# Altium PCB PCB-MAIN.PcbDoc (part 5 of 6)
Units mm, origin at the board's own origin, x right, y up, seen from the top; angles counter-clockwise.
Board outline 110 x 75 mm, 8 copper layers (F.Cu, In1.Cu, In2.Cu, In3.Cu, In4.Cu, In5.Cu, In6.Cu, B.Cu); 251 components, 185 nets, 1143 pads, 853 vias.
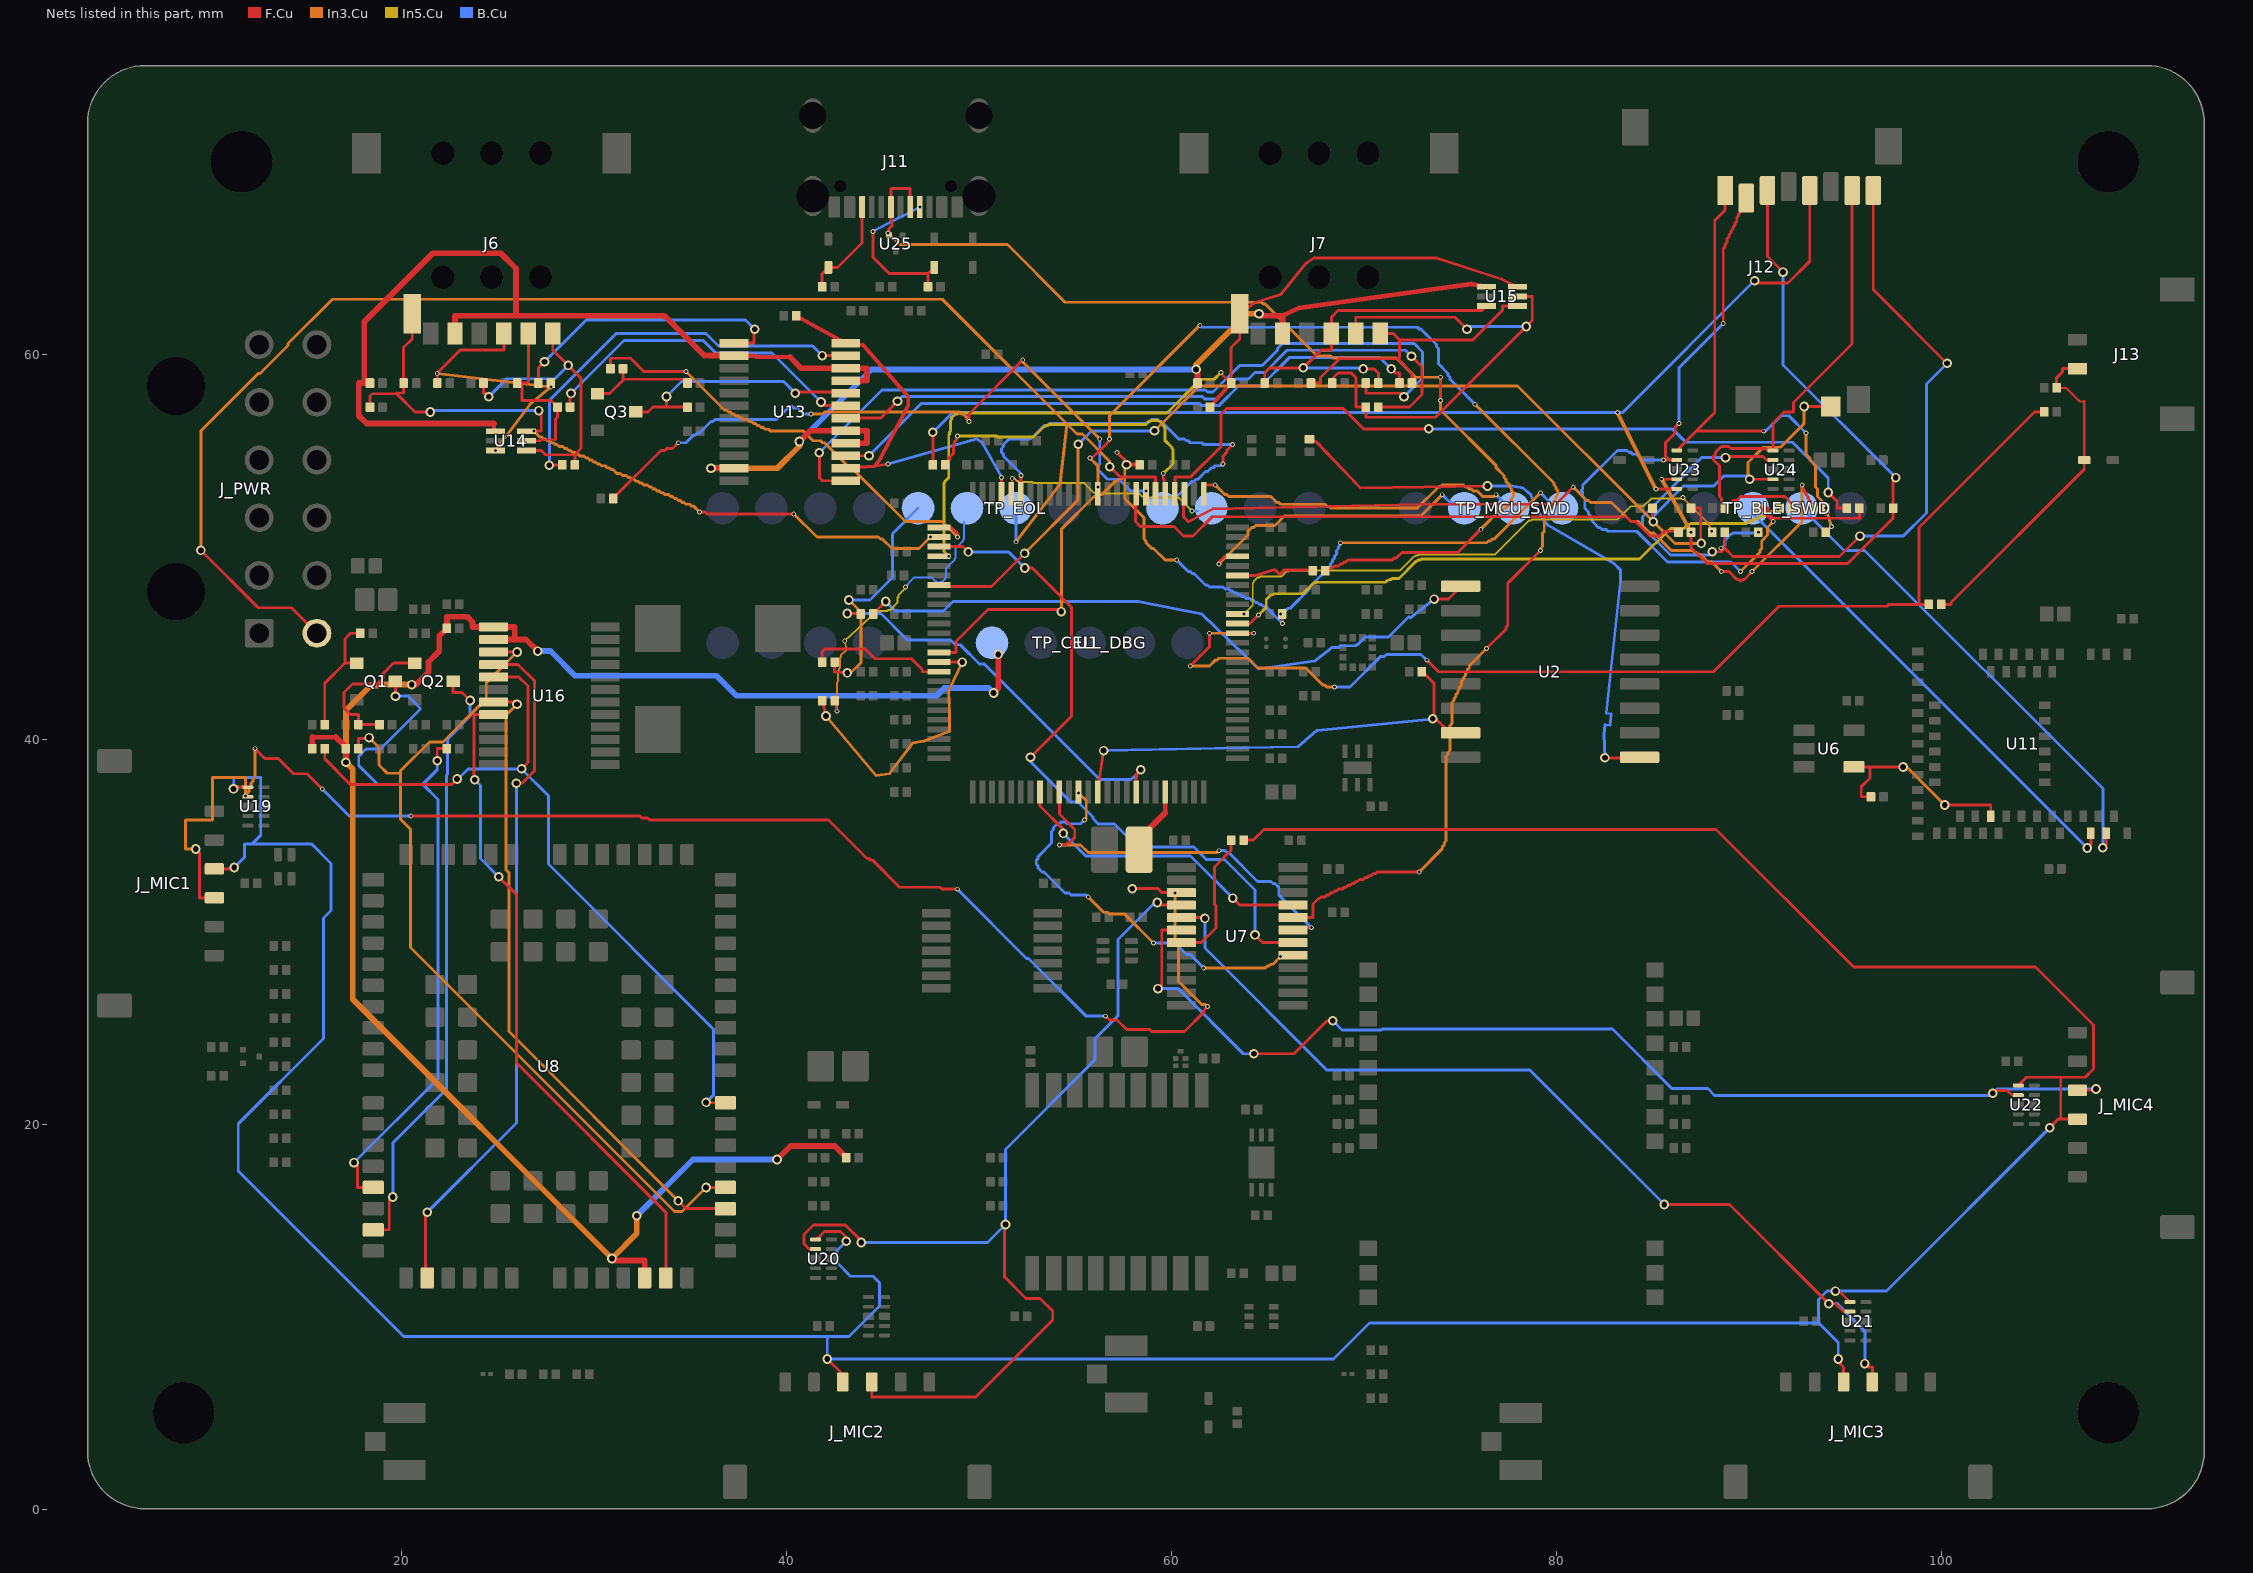
[diagram p10: the nets of this part, all layers, seen from the top]

## Via types
v1: diameter 0.5, hole 0.3, F.Cu to B.Cu, tented both sides, 579 vias
v2: diameter 0.25, hole 0.15, F.Cu to B.Cu, tented both sides, 274 vias

## Nets (pads, with @x,y where several pads share a name; then routed paths per layer and width w, separated by ;. In a path a pad name is that pad's centre, name@x,y a point inside that pad or via, vN(x,y) a via of type N, cw(c..) or ccw(c..) an arc to the next point about the centre after c; other vN are vias at no path point) (continued)
NOR_IO2_U2: R11.2 U2.9 | length 31.1
  F.Cu w0.15: R11.2@67.185,55.6 67.535,55.475 69.835,53.075 v1(76.435,53.175) ; v1(82.535,39.05) 84.285,39.05 84.305,39.05 U2.9@84.335,39.08
  B.Cu w0.15: v1(76.435,53.175) 77.735,53.175 78.285,53.075 78.685,52.725 79.285,51.475 79.585,51.125 83.035,49.125 83.335,48.825 83.335,48.125 82.603,41.369 82.862,41.341 82.797,40.744 82.539,40.772 82.485,40.275 v1(82.535,39.05)
NOR_IO3_U1: R12.1 U1.43 | length 21.1
  F.Cu w0.15: v1(43.16,46.55) R12.1@43.91,46.55 ; U1.43@58.185,37.275 58.16,37.3 58.16,38.175 v1(58.41,38.425)
  B.Cu w0.15: v1(43.16,46.55) 44.91,46.55 46.285,45.175 48.535,45.175 48.785,44.925 49.035,44.925 50.035,43.925 50.285,43.925 56.285,37.925 57.91,37.925 58.035,38.05 58.16,38.05 58.16,38.175 v1(58.41,38.425)
NOR_IO3_U2: R12.2 U2.1 | length 33.9
  F.Cu w0.15: R12.2@44.51,46.525 44.535,46.55 v1(45.16,47.175) ; v1(73.66,47.3) 74.41,47.3 75.035,47.925 U2.1@75.035,47.97
  B.Cu w0.15: v1(45.16,47.175) 45.66,46.675 48.16,46.675 48.66,47.175 58.285,47.175 61.585,46.525 64.535,43.675 67.435,44.075 68.285,44.725 ; 68.335,44.775 68.685,44.775 68.785,44.875 69.585,44.875 69.635,44.925 69.685,44.925 70.085,45.325 71.285,45.325 72.335,46.375 72.385,46.375 ; 72.435,46.325 v1(73.66,47.3)
NOR_NCS_U2: R7.2 U1.39 U2.7 | length 24.3
  F.Cu w0.15: U1.39@56.185,37.275 56.235,37.725 v1(56.485,39.425) ; R7.2@73.01,43.525 73.035,43.55 73.66,42.925 v1@73.66,41.175 ; v1@73.634,41.124 v1(73.585,41.075) v1@73.66,41.175 ; U2.7@75.035,40.35 75.035,40.3 74.535,40.3 v1@73.66,41.175
  B.Cu w0.15: v1(56.485,39.425) 66.585,39.625 67.585,40.475 v1(73.585,41.075)
NRF_RESET_N: R78.2 U6.4 U11.40 | length 10.7
  F.Cu w0.15: U6.4@95.485,38.575 96.312,38.575 ; R78.2@96.36,37.025 95.858,37.025 95.858,37.544 96.312,37.998 96.312,38.575 ; v1(98.028,38.575) 96.312,38.575 ; v1(100.191,36.602) 102.585,36.602 U11.40@102.585,36.025
  In3.Cu w0.15: v1(98.028,38.575) 98.217,38.575 v1(100.191,36.602)
NRF_SWCLK: TP_BLE_SWD.3 U11.53 | length 25.6
  F.Cu w0.15: v1(108.41,34.373) 108.585,34.548 U11.53@108.585,35.125
  B.Cu w0.15: TP_BLE_SWD.3@92.765,52.025 94.962,49.828 96.032,49.828 108.41,37.45 v1(108.41,34.373)
NRF_SWDIO: TP_BLE_SWD.2 U11.51 | length 25.7
  F.Cu w0.15: v1(107.599,34.363) 107.785,34.548 U11.51@107.785,35.125
  B.Cu w0.15: TP_BLE_SWD.2@90.225,52.025 90.225,51.737 v1(107.599,34.363)
NRST: C18.1 R1.2 TP_MCU_SWD.4 U1.14 | length 50.2
  F.Cu w0.15: U1.14@47.935,44.525 48.812,44.525 48.812,45.103 50.473,46.764 54.173,46.764 v1(54.289,46.648) ; v2(57.185,54.925) 57.785,54.325 C18.1@58.285,54.325 ; v1(57.676,54.275) C18.1@58.36,54.275 ; v2(65.785,46.025) R1.2@65.785,46.425
  In3.Cu w0.15: 54.285,50.925 55.985,52.625 56.185,52.625 56.285,52.725 56.385,52.725 57.085,53.425 57.185,53.425 57.285,53.525 57.385,53.525 57.485,53.625 57.585,53.625 ; v1(54.289,46.648) 54.289,50.888 ; v2(57.185,54.925) 57.585,54.525 57.585,52.525 58.585,51.525 58.585,50.425 58.685,50.325 58.685,50.225 58.985,49.925 59.085,49.925 59.685,49.325 v2(60.285,49.325) ; v2(68.785,50.225) 76.385,50.225 76.485,50.325 76.585,50.325 76.685,50.425 76.785,50.425 v2(79.185,52.825)
  B.Cu w0.15: v2(60.285,49.325) 60.885,48.725 60.985,48.725 61.085,48.625 61.185,48.625 61.785,48.025 61.885,48.025 61.985,47.925 62.685,47.925 62.785,47.825 62.985,47.825 63.085,47.725 63.185,47.725 63.285,47.625 63.385,47.625 63.485,47.525 63.585,47.525 63.685,47.425 63.785,47.425 63.885,47.325 64.085,47.325 64.185,47.225 64.285,47.225 64.385,47.125 64.485,47.125 64.585,47.025 64.685,47.025 64.785,46.925 64.885,46.925 v2(65.785,46.025) ; v2(65.685,46.525) 65.885,46.725 65.985,46.725 66.085,46.825 66.185,46.825 67.185,47.825 67.185,47.925 68.285,49.025 68.285,49.125 68.385,49.225 68.385,49.325 68.485,49.425 68.485,49.525 68.585,49.625 68.585,49.825 68.685,49.925 68.685,50.025 68.785,50.125 v2(68.785,50.225) ; v2(79.185,52.825) TP_MCU_SWD.4@79.685,52.325
PDM_CLK: U1.37 U7.17 | length 21
  In3.Cu w0.15: v2(55.185,37.225) 55.585,36.825 55.585,35.925 v2(55.485,35.825) ; v2(55.685,31.825) 56.485,31.025 56.685,31.025 56.785,30.925 57.585,30.925 v2(59.085,29.425) ; v2(61.685,28.125) 64.885,28.125 64.985,28.225 65.085,28.225 65.185,28.325 65.285,28.325 v2(65.685,28.725)
  B.Cu w0.15: v2(55.485,35.825) 55.285,35.625 54.585,35.625 54.485,35.725 54.285,35.725 54.185,35.625 54.085,35.625 53.885,35.425 53.885,35.325 53.785,35.225 53.785,34.625 53.085,33.925 53.085,33.825 52.985,33.725 52.985,33.525 53.085,33.425 53.085,33.325 53.285,33.125 53.385,33.125 54.485,32.025 54.685,32.025 54.785,31.925 55.585,31.925 v2(55.685,31.825) ; v2(59.085,29.425) 60.185,29.425 60.785,28.825 60.985,28.825 v2(61.685,28.125)
PDM_CLK_1V8_FANOUT: J_MIC1.3 J_MIC2.3 J_MIC3.3 J_MIC4.3 R17.2 U19.1 U20.1 U21.1 U22.1 | length 212.5
  F.Cu w0.15: J_MIC1.3@10.275,33.275 11.052,33.275 11.127,33.35 v1(11.308,33.35) ; v1(11.271,37.434) 11.361,37.525 U19.1@12.017,37.525 ; U20.1@41.517,14.025 41.571,14.078 41.631,14.078 41.981,14.428 42.816,14.428 43.117,14.127 v1(43.117,13.935) ; v1(42.123,7.812) 42.935,7 J_MIC2.3@42.935,6.615 ; R17.2@63.76,34.775 64.262,34.775 64.815,35.328 88.309,35.328 95.461,28.177 104.907,28.177 107.924,25.159 107.924,22.884 107.494,22.453 106.219,22.453 ; v1(94.51,11.341) 94.702,11.341 U21.1@95.267,10.775 ; v1(94.66,7.813) 94.66,7.667 94.935,7.392 J_MIC3.3@94.935,6.615 ; U22.1@104.017,22.025 104.446,22.453 106.219,22.453 ; v1(105.648,19.828) 106.094,20.275 106.219,20.275 ; J_MIC4.3@107.095,20.275 106.219,20.275 ; 106.219,20.275 106.219,22.453
  B.Cu w0.15: v1(11.271,37.434) 11.285,38.025 12.685,38.025 12.685,35.025 12.241,34.581 11.851,34.581 ; v1(11.308,33.35) 11.851,33.893 11.851,34.581 ; v1(43.117,13.935) 42.633,13.451 42.633,12.818 43.34,12.112 44.501,12.112 44.843,11.77 44.843,10.565 43.257,8.979 42.123,8.979 ; v1(94.66,7.813) 94.66,8.67 93.643,9.687 ; v1(105.648,19.828) 97.16,11.341 v1(94.51,11.341) 94.081,11.341 93.643,10.903 93.643,9.687 ; 11.851,34.581 15.318,34.581 16.337,33.561 16.337,31.116 15.953,30.732 15.953,24.473 11.519,20.039 11.519,17.573 20.113,8.979 42.123,8.979 ; 42.123,8.979 v1(42.123,7.812) 68.427,7.812 70.302,9.687 93.643,9.687
PDM_CLK_1V8_U7: R17.1 U7.7 | length 7.1
  F.Cu w0.15: U7.7@60.535,29.45 61.562,29.45 62.327,30.215 62.327,31.361 62.245,31.443 62.245,33.383 63.11,34.248 R17.1@63.11,34.775
PDM_DATA1: U1.33 U7.21 | length 16.1
  F.Cu w0.15: U1.33@53.185,37.275 53.185,36.544 54.392,35.337 v1(54.392,35.121) ; v1(63.196,31.76) 63.556,31.4 U7.21@66.335,31.4
  B.Cu w0.15: v1(54.392,35.121) 55.559,33.955 61.001,33.955 v1(63.196,31.76)
PDM_DATA1_1V8: J_MIC1.4 U7.3 U19.2 | length 80.6
  F.Cu w0.15: v1(9.305,34.314) 9.498,34.121 9.498,31.775 J_MIC1.4@10.275,31.775 ; v2(12.385,39.525) 12.885,39.025 13.585,39.025 14.385,38.225 15.085,38.225 v2(15.885,37.425) ; v2(20.485,36.025) 32.385,36.025 32.485,35.925 32.785,35.925 32.885,35.825 42.185,35.825 44.185,33.825 44.285,33.825 44.385,33.725 44.485,33.725 45.885,32.325 47.985,32.325 48.085,32.225 v2(48.885,32.225) ; v2(56.585,25.625) 56.785,25.425 57.185,25.425 57.685,24.925 58.885,24.925 58.985,24.825 60.685,24.825 61.685,25.825 61.685,25.925 v2(61.885,26.125) ; v1(57.977,32.251) 59.307,32.251 59.508,32.05 ; v2(60.185,32.025) 59.508,32.05 ; U7.3@60.535,32.05 59.508,32.05
  In3.Cu w0.15: v1(9.305,34.314) 8.785,34.314 8.785,35.825 10.185,35.825 10.185,38.025 11.885,38.025 v2(11.885,37.075) 11.985,37.125 11.985,37.225 12.085,37.325 12.085,37.425 12.185,37.525 12.185,37.725 12.285,37.825 12.285,37.925 12.385,38.025 v2(12.385,39.525) ; v2(60.185,32.025) 60.185,29.625 60.385,29.425 60.385,27.425 61.585,26.225 61.785,26.225 v2(61.885,26.125)
  B.Cu w0.15: v2(15.885,37.425) 17.285,36.025 v2(20.485,36.025) ; v2(48.885,32.225) 52.485,28.625 52.585,28.625 55.585,25.625 v2(56.585,25.625)
PDM_DATA2: U1.87 U7.20 | length 64.6
  F.Cu w0.15: v2(55.785,54.625) 55.885,54.625 56.785,55.525 v2(56.785,55.625) ; U7.20@66.335,30.75 67.362,30.75 67.362,31.449 67.649,31.736 ; 67.685,31.725 67.785,31.825 67.985,31.825 68.085,31.925 68.185,31.925 68.285,32.025 68.385,32.025 68.485,32.125 68.585,32.125 68.685,32.225 68.885,32.225 68.985,32.325 69.085,32.325 69.185,32.425 69.285,32.425 69.385,32.525 69.485,32.525 69.585,32.625 69.685,32.625 69.785,32.725 69.985,32.725 70.085,32.825 70.185,32.825 70.285,32.925 70.385,32.925 70.485,33.025 70.585,33.025 70.685,33.125 v2(72.885,33.125) ; v2(76.385,44.725) 77.385,45.725 77.385,45.825 77.485,45.925 77.485,48.125 v2(79.185,49.825)
  In3.Cu w0.15: v2(55.785,54.625) 56.185,54.225 v2(56.185,53.125) ; v2(56.785,55.625) 56.785,56.825 v2(61.485,61.525) ; v2(72.885,33.125) 74.085,34.325 74.085,34.425 74.185,34.525 74.185,34.625 74.285,34.725 74.285,39.125 74.385,39.225 74.385,39.325 74.485,39.425 74.485,40.725 74.585,40.825 74.585,41.925 74.685,42.025 74.685,42.125 74.785,42.225 74.785,42.325 74.885,42.425 74.885,42.525 74.985,42.625 74.985,42.725 75.085,42.825 75.085,43.025 75.185,43.125 75.185,43.225 75.285,43.325 75.285,43.425 75.385,43.525 75.385,43.625 75.485,43.725 75.485,43.825 v2(76.385,44.725) ; v2(75.785,57.425) 79.885,53.325 79.885,53.225 79.985,53.125 79.985,53.025 80.085,52.925 80.085,52.725 79.985,52.625 79.985,52.525 79.885,52.425 79.885,52.325 79.385,51.825 79.385,50.825 79.285,50.725 79.285,50.025 79.185,49.925 v2(79.185,49.825)
  B.Cu w0.15: v2(61.485,61.525) 61.585,61.425 72.785,61.425 72.885,61.325 72.985,61.325 73.785,60.525 73.785,60.425 73.885,60.325 73.885,59.525 74.385,59.025 74.385,58.925 74.485,58.825 74.485,58.725 v2(75.785,57.425)
PDM_DATA2_1V8: J_MIC2.4 U7.4 U20.2 | length 52.4
  F.Cu w0.15: U20.2@41.517,13.525 41.18,13.525 40.908,13.797 40.908,14.278 41.41,14.78 43.063,14.78 43.889,13.954 v1(43.889,13.863) ; J_MIC2.4@44.435,6.615 44.435,5.838 49.842,5.838 53.84,9.836 53.84,10.298 53.177,10.961 52.447,10.961 51.329,12.08 51.329,14.743 v1(51.385,14.799) ; v1(59.277,31.534) 59.374,31.534 59.508,31.4 U7.4@60.535,31.4
  B.Cu w0.15: v1(43.889,13.863) 50.449,13.863 v1(51.385,14.799) 51.385,18.703 56.039,23.357 56.039,24.457 57.227,25.645 57.227,29.611 59.15,31.534 v1(59.277,31.534)
PDM_DATA3: U1.35 U7.19 | length 18.8
  F.Cu w0.15: v2(54.185,34.525) 54.485,34.525 54.585,34.625 54.685,34.625 54.985,34.925 54.985,35.325 54.185,36.125 U1.35@54.185,36.825 ; U7.19@66.885,30.125 66.985,30.225 v2(67.285,30.225)
  In3.Cu w0.15: v2(54.185,34.525) 55.285,34.525 55.685,34.125 62.385,34.125 v2(62.485,34.225)
  B.Cu w0.15: v2(62.485,34.225) 62.785,34.225 62.885,34.125 62.985,34.125 64.485,32.625 65.185,32.625 65.285,32.525 65.385,32.525 65.585,32.325 65.585,31.925 v2(67.285,30.225)
PDM_DATA3_1V8: J_MIC3.4 U7.5 U21.2 | length 49.5
  F.Cu w0.15: U7.5@60.535,30.75 61.562,30.75 61.605,30.707 v1(61.748,30.707) ; v1(85.623,15.841) 89.014,15.841 v1(94.17,10.685) 94.52,10.685 94.93,10.275 U21.2@95.267,10.275 ; v1(96.041,7.57) 96.219,7.392 96.435,7.392 J_MIC3.4@96.435,6.615
  B.Cu w0.15: v1(61.748,30.707) 61.748,29.169 68.082,22.835 78.629,22.835 v1(85.623,15.841) ; v1(94.17,10.685) 94.625,10.685 96.041,9.27 v1(96.041,7.57)
PDM_DATA4: U1.3 U7.18 | length 36.1
  F.Cu w0.15: U1.3@47.935,50.025 49.181,50.025 v1(49.455,49.751) ; v1(52.39,48.914) 52.776,48.914 54.818,46.872 54.818,41.214 v1(52.685,39.082) ; v1(64.349,29.85) 64.749,29.45 U7.18@66.335,29.45
  B.Cu w0.15: v1(49.455,49.751) 51.552,49.751 v1(52.39,48.914) ; v1(52.685,39.082) 52.685,38.848 54.777,36.757 55.148,36.757 55.933,35.971 55.933,35.891 56.207,35.617 57.058,35.617 58.267,34.409 61.181,34.409 61.819,33.771 62.766,33.771 64.349,32.188 v1(64.349,29.85)
PDM_DATA4_1V8: J_MIC4.4 U7.6 U22.2 | length 59.3
  F.Cu w0.15: v1(59.309,27.058) 59.508,27.257 59.508,30.1 U7.6@60.535,30.1 ; v1(64.296,23.673) 66.385,23.673 68.098,25.386 v1(68.398,25.386) ; v1(102.683,21.619) 102.833,21.77 103.437,21.77 103.682,21.525 U22.2@104.017,21.525 ; J_MIC4.4@107.095,21.775 107.984,21.775 v1(108.053,21.844)
  B.Cu w0.15: v1(59.309,27.058) 60.36,27.058 63.745,23.673 v1(64.296,23.673) ; v1(68.398,25.386) 68.869,24.915 70.915,24.915 70.951,24.951 82.921,24.951 86.013,21.859 87.885,21.859 88.235,21.509 102.572,21.509 v1(102.683,21.619) 102.907,21.844 v1(108.053,21.844)
PWR_FAULT: R103.2 U1.82 | length 35.5
  F.Cu w0.15: R103.2@31.085,52.625 33.485,55.025 33.685,55.025 33.785,55.125 34.085,55.125 v2(34.385,55.425) ; v2(49.485,56.525) 49.485,56.925 v2(52.285,59.725)
  In3.Cu w0.15: v2(41.285,56.925) 41.885,56.925 41.985,57.025 48.985,57.025 49.085,56.925 49.185,56.925 49.385,56.725 49.385,56.625 v2(49.485,56.525) ; v2(52.285,59.725) 52.285,59.625 v2(56.285,55.625)
  B.Cu w0.15: v2(34.385,55.425) 34.785,55.425 35.185,55.825 35.285,55.825 35.385,55.925 35.485,55.925 36.085,56.525 36.185,56.525 36.285,56.625 39.485,56.625 40.085,57.225 40.185,57.225 40.285,57.325 40.385,57.225 40.585,57.225 40.885,56.925 v2(41.285,56.925) ; v2(56.285,55.625) 56.285,54.325 56.185,54.225 56.185,54.025 56.685,53.525 57.285,53.525 57.885,52.925 v2(58.685,52.925)
PWR_GOOD: J_PWR.7 TP_EOL.7 U1.81 | length 80.1
  F.Cu w0.15: v1(9.578,49.83) 12.558,46.85 14.28,46.85 J_PWR.7@15.605,45.525 ; v1(56.806,54.179) 57.333,53.652 59.185,53.652 U1.81@59.185,52.775
  In3.Cu w0.15: v1(9.578,49.83) 9.578,56.048 12.555,59.025 12.655,59.025 14.105,60.475 14.105,60.575 16.411,62.881 48.104,62.881 55.109,55.876 55.38,55.876 56.806,54.45 v1(56.806,54.179) ; v2(51.925,50.275) 54.225,53.275 54.585,56.4
  B.Cu w0.15: v2(51.925,50.275) TP_EOL.7@51.925,52.025
Q1_BASE: Q1.1 R24.2 R25.1 | length 6.4
  F.Cu w0.15: R24.2@16.01,40.775 16.01,41.302 16.01,42.927 17.058,43.975 ; Q1.1@17.685,43.975 17.058,43.975 ; R25.1@17.86,45.525 17.358,45.525 17.058,45.225 17.058,43.975
Q2_BASE: Q2.1 R26.2 R27.1 | length 7.8
  F.Cu w0.15: R27.1@18.86,40.775 R26.2@17.76,40.775 17.76,41.302 17.354,41.302 17.005,41.651 17.005,42.437 17.452,42.884 18.738,42.884 19.048,43.194 19.048,43.431 19.592,43.975 Q2.1@20.685,43.975
Q3_BASE: Q3.1 R46.2 R47.1 | length 5.6
  F.Cu w0.15: Q3.1@30.185,57.975 30.812,57.975 31.51,58.673 31.51,58.724 ; R46.2@31.51,59.275 31.51,58.724 ; R47.1@34.86,58.525 34.661,58.724 31.51,58.724
REV_STRAP0: TP_EOL.10 U1.95 | length 20.1
  F.Cu w0.15: U1.95@52.185,53.225 v2(52.185,53.725) ; v2(62.685,54.325) 62.685,54.725 62.885,54.925 62.885,55.025 v2(63.185,55.325)
  B.Cu w0.15: v2(52.185,53.725) 52.185,53.825 51.285,54.725 51.285,54.825 51.185,54.925 51.185,55.125 51.285,55.225 51.285,55.325 51.585,55.625 52.685,55.625 53.385,56.325 53.585,56.325 53.685,56.425 58.685,56.425 58.785,56.525 58.885,56.525 58.985,56.625 59.285,56.625 59.385,56.525 59.485,56.525 60.385,55.625 60.685,55.625 60.785,55.525 60.885,55.525 60.985,55.425 61.585,55.425 61.685,55.325 v2(63.185,55.325) ; TP_EOL.10@60.085,52.425 61.085,53.425 61.185,53.425 61.285,53.525 61.385,53.525 61.785,53.925 61.885,53.925 62.085,54.125 62.185,54.125 62.285,54.225 62.585,54.225 v2(62.685,54.325)
REV_STRAP1: TP_EOL.11 U1.96 | length 10.7
  F.Cu w0.1: U1.96@51.685,53.225 51.735,53.275 v2(51.735,53.575)
  In5.Cu w0.1: v2(51.735,53.575) 51.835,53.575 51.985,53.425 52.035,53.425 52.085,53.375 52.785,53.375 52.835,53.325 55.485,53.325 55.985,52.825 56.035,52.825 56.085,52.775 58.335,52.775 58.485,52.625 58.535,52.625 58.585,52.575 60.385,52.575 v2(61.085,51.875)
  B.Cu w0.1: v2(61.085,51.875) TP_EOL.11@61.385,51.875
SD_CK_CARD: J12.5 R79.2 U23.5 | length 60.2
  F.Cu w0.15: R79.2@47.61,54.275 47.61,55.966 v1(47.611,55.967) ; v2(85.185,53.025) U23.5@86.267,53.025 ; v1(90.313,63.846) 90.428,63.731 92.052,63.731 93.18,64.859 J12.5@93.18,68.535
  In3.Cu w0.2: v2(83.185,56.998) v2(85.185,53.025)
  B.Cu w0.15: v1(47.611,55.967) 48.642,56.998 83.464,56.998 v1(90.313,63.846)
SD_CK_U1: R79.1 U1.80 | length 16.5
  F.Cu w0.15: R79.1@48.335,54.375 48.485,54.525 48.485,54.675 48.685,54.875 48.685,55.325 48.735,55.375 48.735,55.475 48.835,55.575 48.835,55.725 v2(48.885,55.775) ; v2(59.585,53.825) 59.585,53.525 59.635,53.475 59.635,53.175 U1.80@59.685,53.125
  In5.Cu w0.15: v2(48.885,55.775) 50.935,55.775 50.985,55.725 52.835,55.725 53.385,56.275 53.435,56.275 53.485,56.325 53.585,56.325 53.635,56.375 58.685,56.375 58.835,56.525 58.885,56.525 58.935,56.575 59.335,56.575 59.435,56.475 59.485,56.475 59.585,56.375 59.585,56.325 59.635,56.275 59.635,56.225 59.685,56.175 59.685,55.525 60.035,55.175 60.035,55.125 60.085,55.075 60.085,54.325 v2(59.585,53.825)
SD_CMD_CARD: J12.3 R80.2 R85.2 U23.4 | length 36.4
  F.Cu w0.15: v2(85.485,53.525) U23.4@86.267,53.525 ; v2(87.01,50.775) 87.01,50.248 87.01,49.982 87.852,49.141 95.153,49.141 97.51,51.498 R85.2@97.51,52.025 97.51,53.475 v1(97.646,53.611) ; J12.3@90.98,68.535 90.98,65.099 v1(91.789,64.29)
  In3.Cu w0.2: v2(85.485,53.525) v2(87.01,50.775)
  B.Cu w0.15: v1(91.789,64.29) 91.789,59.468 v1(97.646,53.611)
SD_CMD_U1: R80.1 U1.83 | length 31
  F.Cu w0.15: U1.83@58.135,52.825 58.135,51.325 58.385,51.075 60.135,51.075 60.635,50.575 61.135,50.575 62.135,51.575 83.635,51.575 83.885,51.325 84.135,51.325 84.885,50.575 85.385,50.575 85.635,50.825 R80.1@86.385,50.825
SD_D0_CARD: J12.7 R81.2 R86.2 U24.1 | length 25.7
  F.Cu w0.15: R86.2@88.685,52.125 88.685,52.325 88.585,52.425 88.585,52.525 88.485,52.625 88.485,54.225 88.185,54.525 88.185,54.725 88.285,54.825 88.285,54.925 88.585,55.225 88.985,55.225 89.085,55.125 90.885,55.125 90.985,55.025 U24.1@91.285,55.025 ; R86.2@88.785,52.125 88.985,52.325 89.085,52.325 89.185,52.425 89.385,52.425 89.585,52.625 91.885,52.625 92.185,52.325 R81.2@92.185,52.125 ; U24.1@91.267,55.025 91.267,56.448 91.847,57.027 92.34,57.027 92.34,57.52 95.38,60.56 J12.7@95.38,68.535
SD_D0_U1: R81.1 U1.65 | length 30.3
  F.Cu w0.15: U1.65@63.885,46.025 64.085,46.025 v2(64.535,46.475)
  In5.Cu w0.15: v2(64.535,46.475) 64.935,46.875 64.935,47.275 65.185,47.525 65.285,47.525 65.335,47.575 66.835,47.575 67.385,48.125 67.485,48.125 67.535,48.175 71.135,48.175 71.235,48.275 71.285,48.275 71.335,48.325 71.435,48.325 71.485,48.375 71.835,48.375 72.735,49.275 72.785,49.275 72.835,49.325 72.935,49.325 72.985,49.375 84.335,49.375 85.935,50.975 86.635,50.975 86.835,51.175 86.935,51.175 86.985,51.225 89.885,51.225 89.935,51.275 89.985,51.275 90.035,51.325 90.085,51.325 90.135,51.375 90.235,51.375 90.285,51.425 90.335,51.425 90.385,51.475 90.435,51.475 90.485,51.525 90.535,51.525 90.585,51.575 90.635,51.575 90.685,51.625 90.785,51.625 90.835,51.675 90.885,51.675 90.935,51.725 90.985,51.725 91.035,51.775 91.085,51.775 91.135,51.825 91.185,51.825 91.235,51.875 91.335,51.875 91.385,51.925 91.435,51.925 91.485,51.975 v2(91.535,51.975)
SD_D1_CARD: J12.8 R82.2 R87.2 U24.2 | length 47.6
  F.Cu w0.15: v1(88.11,49.761) 88.577,49.761 88.76,49.944 ; v2(88.56,49.944) 88.76,49.944 ; R82.2@88.76,50.775 88.76,49.944 ; v1(88.804,54.652) 88.854,54.702 90.753,54.702 90.93,54.525 U24.2@91.267,54.525 ; v1(95.788,50.572) 94.726,49.51 89.194,49.51 88.76,49.944 ; J12.8@96.48,68.535 96.48,63.385 v1(100.317,59.549)
  B.Cu w0.15: v1(88.11,49.761) 87.935,49.586 85.938,49.586 84.482,51.042 84.482,51.567 87.568,54.652 v1(88.804,54.652) ; v2(88.56,49.944) 88.585,49.925 88.785,50.125 88.785,50.375 89.085,50.675 89.135,50.675 89.185,50.725 90.435,50.725 90.485,50.775 v2(90.51,50.775) ; v1(95.788,50.572) 98.038,50.572 99.239,51.774 99.239,58.471 v1(100.317,59.549)
SD_D1_U1: R82.1 U1.66 | length 28.4
  In3.Cu w0.1: v2(86.585,52.575) 87.885,51.275 87.885,51.225 87.935,51.175 87.935,51.125 87.985,51.075 87.985,51.025 88.035,50.975 88.035,50.925 88.085,50.875 v2(88.085,50.825)
  In5.Cu w0.1: v2(63.785,46.525) 64.235,46.975 64.235,48.125 64.285,48.175 64.285,48.225 64.485,48.425 64.585,48.425 64.635,48.475 65.735,48.475 65.985,48.725 66.085,48.725 66.135,48.775 71.885,48.775 72.635,49.525 72.685,49.525 72.735,49.575 72.835,49.575 72.885,49.625 76.835,49.625 78.585,51.375 78.685,51.375 78.735,51.425 83.185,51.425 83.885,52.125 84.535,52.125 84.935,52.525 86.535,52.525 v2(86.585,52.575)
SD_D2_CARD: J12.1 R83.2 R88.2 U23.1 | length 27.3
  F.Cu w0.15: U23.1@86.267,55.025 88.244,57.001 88.244,66.972 88.78,67.508 J12.1@88.78,68.535 ; 87.285,56.025 v2(90.785,56.025) ; R88.2@94.01,50.775 v2(94.31,51.075)
  In3.Cu w0.15: v2(92.985,55.925) 92.985,54.825 93.185,54.625 93.185,54.525 93.485,54.225 93.485,53.125 93.585,53.025 93.585,52.625 93.885,52.325 93.885,52.225 93.985,52.125 93.985,51.725 v2(94.01,52.025) v2(94.31,51.075)
  B.Cu w0.15: v2(90.785,56.025) 90.885,56.025 91.685,56.825 92.085,56.825 v2(92.985,55.925)
SD_D2_U1: R83.1 U1.78 | length 40.6
  F.Cu w0.15: U1.78@60.635,52.825 60.635,51.575 60.885,51.325 62.135,51.975 72.985,52.225 79.985,52.225 v2(80.885,53.125) ; v2(88.585,48.725) 88.985,48.725 89.385,48.325 89.485,48.325 89.585,48.225 89.685,48.325 89.785,48.325 v2(90.185,48.725) ; v2(92.785,53.225) 92.785,53.125 92.885,53.025 92.885,52.925 92.985,52.825 92.985,52.725 93.085,52.625 93.085,52.525 93.185,52.425 93.185,52.325 93.285,52.225 R83.1@93.285,52.125
  In3.Cu w0.15: v2(80.885,53.125) 81.585,52.425 81.685,52.425 81.785,52.325 82.885,52.325 83.885,51.325 84.285,51.325 84.885,50.725 85.085,50.725 85.985,49.825 87.085,49.825 87.185,49.725 87.285,49.725 87.385,49.625 87.485,49.625 87.885,49.225 88.085,49.225 v2(88.585,48.725) ; v2(90.185,48.725) 92.785,51.325 v2(92.785,53.225)
SD_D3_CARD: J12.2 R84.2 R89.2 U23.2 | length 42
  F.Cu w0.15: v2(85.585,54.525) U23.2@86.267,54.525 ; 85.885,54.525 85.685,54.725 85.685,55.425 86.185,55.925 86.185,56.225 v2(86.385,56.425) ; v2(88.685,61.625) 88.685,65.525 88.785,65.625 88.785,65.725 88.885,65.825 88.885,66.025 88.985,66.125 88.985,66.225 89.085,66.325 89.085,66.425 89.185,66.525 89.185,66.625 89.285,66.725 89.285,66.825 89.385,66.925 89.385,67.125 89.485,67.225 89.485,67.325 J12.2@89.685,67.525 ; R89.2@90.51,52.025 91.012,52.025 91.012,51.743 91.257,51.498 95.76,51.498 R84.2@95.76,52.025 ; R89.2@90.585,52.025 v2(91.285,51.325)
  In3.Cu w0.15: v2(89.585,48.725) 90.585,49.725 90.585,49.825 90.685,49.925 90.685,50.325 90.985,50.625 90.985,51.025 v2(91.285,51.325)
  B.Cu w0.15: v2(85.585,54.525) 84.485,54.525 84.185,54.825 83.985,54.825 83.885,54.925 83.785,54.925 83.685,55.025 83.185,55.025 81.385,53.225 81.385,53.025 81.285,52.925 81.385,52.825 81.385,52.625 81.485,52.525 81.485,52.025 81.685,51.825 81.685,51.725 81.785,51.625 81.785,51.525 81.885,51.425 81.885,51.325 82.185,51.025 82.285,51.025 82.385,50.925 82.585,50.925 82.685,50.825 84.185,50.825 85.785,49.225 89.085,49.225 v2(89.585,48.725) ; v2(86.385,56.425) 86.385,59.325 v2(88.685,61.625)
SD_D3_U1: R84.1 U1.79 | length 41
  F.Cu w0.15: U1.79@60.185,52.775 60.185,53.652 61.012,53.652 62.595,55.235 62.595,56.918 62.877,57.199 68.94,57.199 69.992,56.147 v1(73.384,56.147) ; v1(94.138,52.835) 94.608,52.366 94.608,52.025 R84.1@95.11,52.025
  B.Cu w0.15: v1(73.384,56.147) 86.032,56.147 86.733,55.446 92.281,55.446 94.138,53.589 v1(94.138,52.835)
SD_DET: C76.1 J12.CD R90.2 U1.7 U24.4 | length 66.5
  F.Cu w0.15: U1.7@47.935,48.025 48.008,47.952 50.658,47.952 v1(52.379,49.673) ; R90.2@85.01,52.025 85.01,51.356 v1(85.043,51.323) ; C76.1@87.01,52.025 87.512,52.025 87.512,50.226 v1(87.547,50.192) ; v1(90.052,53.525) U24.4@91.267,53.525 ; v1(92.885,57.305) J12.CD@94.27,57.305
  In3.Cu w0.15: v1(52.379,49.673) 55.162,52.456 v1(55.162,55.349) ; v1(59.129,56.042) 61.456,58.368 77.998,58.368 v1(85.043,51.323) 86.174,50.192 v1(87.547,50.192) ; v1(90.052,53.525) 89.978,53.599 89.978,54.401 90.766,55.19 91.665,55.19 92.885,56.41 v1(92.885,57.305)
  B.Cu w0.15: v1(55.162,55.349) 55.854,56.042 v1(59.129,56.042) ; v1(85.043,51.323) 85.043,51.591 86.621,53.169 88.192,53.169 88.712,53.69 89.887,53.69 v1(90.052,53.525)
SIM1_CLK_CONN: C55.1 J6.3 R51.2 U14.4 | length 15.9
  F.Cu w0.15: C55.1@24.26,58.525 24.26,57.998 24.348,57.998 v1(24.535,57.811) ; U14.4@26.49,55.025 27.262,55.025 27.485,54.802 29.01,54.802 ; J6.3@27.86,61.095 27.86,60.248 v1(28.666,59.444) 29.334,58.774 29.334,55.126 29.01,54.802 ; R51.2@29.01,54.275 29.01,54.802
  B.Cu w0.15: v1(24.535,57.811) 25.474,58.75 27.972,58.75 v1(28.666,59.444)
SIM1_CLK_MUX: R51.1 U13.23 | length 21.4
  F.Cu w0.15: v1(27.682,54.258) 27.841,54.258 27.858,54.275 R51.1@28.36,54.275 ; v1(41.86,59.95) U13.23@43.085,59.95
  B.Cu w0.15: v1(27.682,54.258) 27.682,57.621 31.157,61.096 35.825,61.096 36.477,60.443 41.366,60.443 v1(41.86,59.95)
SIM1_DATA_CONN: C56.1 J6.6 R52.2 U14.5 | length 9.3
  F.Cu w0.112: U14.5@26.49,55.525 27.243,55.525 27.318,55.6 28.012,55.6
  F.Cu w0.15: C56.1@26.01,58.525 26.261,58.525 ; J6.6@26.59,61.095 26.59,58.603 26.512,58.525 26.261,58.525 ; 28.012,55.6 28.012,56.65 28.11,56.748 28.11,57.267 R52.2@28.11,57.275 27.762,57.623 26.261,57.623 26.261,58.525
SIM1_DATA_MUX: R52.1 U13.19 | length 17.6
  F.Cu w0.15: R52.1@28.76,57.275 28.76,57.802 28.808,57.85 v1(28.808,57.988) ; v1(41.801,57.542) 41.992,57.35 U13.19@43.085,57.35
  B.Cu w0.15: v1(28.808,57.988) 31.563,60.744 35.679,60.744 36.331,60.092 39.251,60.092 v1(41.801,57.542)
SIM1_DET: C52.1 J6.7 R48.2 U1.2 U14.6 | length 39.8
  F.Cu w0.112: 18.36,57.85 18.479,57.969 19.754,57.969 ; 19.754,58 20.11,58
  F.Cu w0.15: R48.2@18.36,57.275 18.36,57.85 ; 19.754,58 19.754,57.969 20.704,57.019 v1(21.492,57.019) ; 20.11,58 C52.1@20.11,58.525 20.11,60.368 20.56,60.818 J6.7@20.56,62.12 ; U14.6@26.49,56.025 27.262,56.025 27.262,56.963 v1(27.132,57.092) ; v2(35.485,51.825) 35.785,51.825 35.885,51.725 v2(40.385,51.725)
  In3.Cu w0.15: v2(26.885,56.025) 27.185,55.725 27.285,55.725 27.385,55.625 27.485,55.625 27.585,55.525 27.685,55.525 27.785,55.425 27.885,55.425 27.985,55.325 28.085,55.325 28.185,55.225 28.385,55.225 28.485,55.125 28.585,55.125 28.685,55.025 28.785,55.025 28.885,54.925 28.985,54.925 29.085,54.825 29.185,54.825 29.285,54.725 29.485,54.725 29.585,54.625 29.685,54.625 29.785,54.525 29.885,54.525 29.985,54.425 30.085,54.425 30.185,54.325 30.285,54.325 30.385,54.225 30.585,54.225 30.685,54.125 30.785,54.125 30.885,54.025 30.985,54.025 31.185,53.825 31.385,53.825 31.485,53.725 31.685,53.725 31.785,53.625 31.885,53.625 31.985,53.525 32.085,53.525 32.185,53.425 32.285,53.425 32.385,53.325 32.485,53.325 32.585,53.225 32.785,53.225 32.885,53.125 32.985,53.125 33.085,53.025 33.185,53.025 33.285,52.925 33.385,52.925 33.485,52.825 33.585,52.825 33.685,52.725 33.885,52.725 33.985,52.625 34.085,52.625 34.185,52.525 34.285,52.525 34.385,52.425 34.485,52.425 34.585,52.325 34.685,52.325 34.785,52.225 34.985,52.225 35.085,52.125 35.185,52.125 v2(35.485,51.825) ; v2(40.385,51.725) 41.585,50.525 44.785,50.525 44.885,50.425 44.985,50.425 45.485,49.925 46.885,49.925 v2(47.485,50.525)
  B.Cu w0.15: v1(21.492,57.019) 21.565,57.092 v1(27.132,57.092)
SIM1_RST_CONN: C54.1 J6.2 R50.2 U14.3 | length 15.9
  F.Cu w0.15: C54.1@21.86,58.525 21.86,59.052 23.056,60.248 25.32,60.248 J6.2@25.32,61.095 ; v2(27.76,58.325) R50.2@27.76,58.525
  In3.Cu w0.15: v2(21.86,59.025) v2(27.76,58.325) 26.685,57.425 v2(24.88,55.025)
SIM1_RST_MUX: R50.1 U13.1 | length 15
  F.Cu w0.15: R50.1@27.11,58.525 27.11,59.305 v1(27.433,59.628) ; U13.1@37.285,60.6 38.312,60.6 38.312,61.277 v1(38.357,61.322)
  B.Cu w0.15: v1(27.433,59.628) 29.604,61.799 37.88,61.799 v1(38.357,61.322)
SIM1_VDD_CONN: C50.1 J6.1 U13.2 U13.21 U13.22 U14.1 | length 50.4
  F.Cu w0.225: 24.81,56.417 24.81,56.095 U14.1@24.88,56.025 ; U13.2@37.285,59.95 38.349,59.95 38.424,59.875 40.185,59.875
  F.Cu w0.3: C50.1@18.36,58.525 18.059,58.525 ; J6.1@22.78,61.095 22.78,62.017 25.955,62.017 ; 24.81,56.417 18.196,56.417 17.783,56.83 17.783,58.525 18.059,58.525 ; U13.2@37.285,59.95 35.734,59.95 33.667,62.017 25.955,62.017 ; 40.185,59.875 40.76,59.3 U13.22@43.085,59.3 44.187,59.3 44.187,58.65 U13.21@43.085,58.65 ; 18.059,58.525 18.059,61.707 21.627,65.275 25.157,65.275 25.955,64.478 25.955,62.017
SIM2_CLK_CONN: C58.1 J7.3 R54.2 U15.4 | length 15.9
  F.Cu w0.15: C58.1@67.26,58.525 67.762,58.525 67.762,58.81 68.739,59.786 71.776,59.786 ; J7.3@70.86,61.095 71.537,61.095 71.87,60.761 ; R54.2@72.51,58.525 72.51,58.964 72.51,59.051 72.51,59.052 71.776,59.786 ; U15.4@77.99,62.525 77.218,62.525 77.218,62.312 75.668,60.761 71.87,60.761 ; 71.776,59.786 71.87,59.881 71.87,60.761
SIM2_CLK_MUX: R54.1 U13.15 | length 31.8
  F.Cu w0.15: U13.15@43.085,54.75 v1(44.292,54.75) ; v1(71.437,59.26) 71.644,59.052 71.86,59.052 R54.1@71.86,58.525
  B.Cu w0.15: v1(44.292,54.75) 47.009,57.467 61.476,57.467 61.593,57.35 62.467,57.35 63.496,58.378 64.665,58.378 66.131,59.845 70.852,59.845 v1(71.437,59.26)
SIM2_DATA_CONN: C59.1 J7.6 R55.2 U15.5 | length 27
  F.Cu w0.15: C59.1@68.36,58.525 68.36,58.742 68.67,59.052 69.354,59.052 69.608,58.798 69.608,57.275 R55.2@70.11,57.275 70.11,56.748 73.734,56.748 v1(78.447,61.461) 78.762,61.776 78.762,63.025 U15.5@77.99,63.025 ; J7.6@69.59,61.095 69.59,61.942 74.742,61.942 v1(75.365,61.319)
  B.Cu w0.15: v1(75.365,61.319) 75.508,61.461 v1(78.447,61.461)
SIM2_DATA_MUX: R55.1 U13.18 | length 35.8
  F.Cu w0.15: U13.18@43.085,56.7 44.892,56.7 v1(45.774,57.582) ; R55.1@70.76,57.275 72.382,57.275 73.03,57.922 73.03,59.371 v1(72.486,59.915)
  B.Cu w0.15: v1(45.774,57.582) 46.011,57.819 61.621,57.819 61.739,57.701 62.322,57.701 63.35,58.73 64.008,58.73 64.36,59.082 64.871,59.082 65.875,60.086 66.02,60.231 72.17,60.231 v1(72.486,59.915)
SIM2_DET: C53.1 J7.7 R49.2 U1.4 U15.6 | length 44.4
  F.Cu w0.15: U1.4@48.385,49.525 v2(48.435,49.525) ; v2(62.585,59.075) 62.585,59.025 C53.1@63.035,58.575 ; C53.1@63.11,58.525 63.11,60.368 63.56,60.818 63.56,62.058 J7.7@63.56,62.12 64.385,62.725 65.685,63.125 66.985,64.725 67.385,65.025 73.785,65.025 77.185,63.925 U15.6@77.99,63.525
  F.Cu w0.2: R49.2@62.01,57.275 C53.1@63.11,58.525
  In5.Cu w0.15: v2(48.435,49.525) 48.185,49.775 48.185,53.325 48.235,53.375 48.235,53.425 48.435,53.625 48.435,55.825 48.485,55.875 48.485,55.975 48.535,56.025 48.535,56.575 48.585,56.625 48.585,56.725 48.785,56.925 48.885,56.925 48.935,56.975 59.785,56.975 61.535,58.725 62.235,58.725 v2(62.585,59.075)
SIM2_RST_CONN: C57.1 J7.2 R53.2 U15.3 | length 19
  F.Cu w0.15: C57.1@64.86,58.525 64.86,59.052 65.125,59.317 v1(66.863,59.317) 67.794,60.248 68.32,60.248 J7.2@68.32,61.095 68.32,61.942 68.672,62.293 76.148,62.293 U15.3@76.38,62.525 ; v1(69.983,59.26) 70.552,59.26 70.76,59.052 R53.2@70.76,58.525
  B.Cu w0.15: v1(66.863,59.317) 69.926,59.317 v1(69.983,59.26)
SIM2_RST_MUX: R53.1 U13.13 | length 42.1
  F.Cu w0.15: v1(41.713,54.909) 41.713,53.603 41.866,53.45 U13.13@43.085,53.45 ; R53.1@70.11,58.525 70.11,57.998 71.903,57.998 v1(72.092,57.809)
  B.Cu w0.15: v1(41.713,54.909) 44.976,58.172 61.766,58.172 61.884,58.053 62.176,58.053 63.556,59.433 64.725,59.433 65.524,60.232 65.524,60.32 65.786,60.582 72.622,60.582 73.062,60.142 73.062,58.78 v1(72.092,57.809)
SIM2_VDD_CONN: C51.1 J7.1 U13.11 U13.16 U13.17 U15.1 | length 52.5
  F.Cu w0.25: 65.78,62.017 66.63,62.425 75.58,63.675 U15.1@76.38,63.525
  F.Cu w0.3: v1(36.082,54.102) 36.084,54.1 U13.11@37.285,54.1 ; v1(40.675,55.488) 41.238,56.05 41.983,56.05 U13.17@43.085,56.05 44.187,56.05 44.187,55.4 U13.16@43.085,55.4 ; v1(61.29,59.235) 61.36,59.164 C51.1@61.36,58.525 ; v1(64.561,62.126) 64.671,62.017 65.78,62.017 65.78,62.015 65.78,61.891 J7.1@65.78,61.095
  In3.Cu w0.3: v1(36.082,54.102) 39.526,54.102 40.675,55.251 v1(40.675,55.488) ; v1(61.29,59.235) 61.29,59.478 63.938,62.126 v1(64.561,62.126)
  B.Cu w0.3: v1(40.675,55.488) 44.422,59.235 v1(61.29,59.235)
SIM_MUX_EN: R46.1 U1.1 | length 23.2
  F.Cu w0.15: R46.1@30.86,59.275 30.86,59.802 31.885,59.825 32.585,59.125 v2(34.785,59.125) ; U1.1@48.385,51.025 48.585,51.025 48.885,50.725 v2(48.885,50.525)
  In3.Cu w0.15: v2(34.785,59.125) 36.785,57.125 36.885,57.125 36.985,57.025 37.085,57.025 37.185,56.925 37.285,56.925 37.385,56.825 37.485,56.825 37.585,56.725 37.685,56.725 37.785,56.625 37.985,56.625 38.085,56.525 38.185,56.525 38.285,56.425 38.385,56.425 38.485,56.325 38.585,56.325 38.685,56.225 38.785,56.225 38.885,56.125 39.085,56.125 39.185,56.025 40.885,56.025 41.385,55.525 41.785,55.525 41.885,55.425 41.985,55.425 43.285,54.125 43.385,54.125 46.185,51.325 48.085,51.325 v2(48.885,50.525)
SIM_MUX_SEL: R45.1 U1.97 U13.14 U13.24 | length 21.8
  F.Cu w0.15: 44.585,54.2 v2(45.285,54.325) ; U1.97@51.185,52.775 v2(51.185,53.625)
  F.Cu w0.2: R45.1@40.51,62.025 U13.24@43.085,60.6 43.985,60.5 46.335,57.8 46.335,57.35 44.885,54.6 44.585,54.2 U13.14@43.085,54.1
  B.Cu w0.15: v2(45.285,54.325) 49.885,55.625 50.185,55.425 v2(51.185,53.625)
SMPS_SW: L1.1 U1.46 | length 4.1
  F.Cu w0.225: 59.685,36.2 U1.46@59.685,37.275
  F.Cu w0.3: L1.1@57.76,34.275 L1.1@58.335,34.275 58.337,34.852 59.685,36.2
SWCLK: TP_MCU_SWD.3 U1.76 | length 16.9
  F.Cu w0.15: U1.76@61.685,53.225 v2(62.285,53.225)
  In3.Cu w0.15: v2(62.285,53.225) 62.785,52.725 62.885,52.725 62.985,52.625 65.185,52.625 65.485,52.325 65.585,52.325 65.685,52.225 67.985,52.225 68.085,52.125 68.185,52.125 68.285,52.025 72.785,52.025 73.885,53.125 73.985,53.125 74.085,53.225 75.185,53.225 75.285,53.125 75.385,53.125 75.485,53.025 75.585,53.025 75.685,52.925 75.885,52.925 76.185,52.625 76.785,52.625 v2(76.885,52.725)
  B.Cu w0.15: v2(76.885,52.725) TP_MCU_SWD.3@77.185,52.425
SWDIO: TP_MCU_SWD.2 U1.72 | length 14.6
  F.Cu w0.15: v2(62.485,49.125) 62.485,49.225 62.785,49.525 U1.72@62.985,49.525
  In3.Cu w0.15: v2(62.485,49.125) 63.985,50.625 63.985,50.825 64.185,51.025 64.285,51.025 64.385,51.125 65.385,51.125 65.885,51.625 72.985,51.625 v2(74.085,52.725)
  B.Cu w0.15: v2(74.085,52.725) 74.485,52.325 TP_MCU_SWD.2@74.585,52.325
TAMPER_IN_CONN: D9.1 J13.1 R99.2 R100.1 | length 17.6
  F.Cu w0.112: R99.2@106.01,58.275 106.493,58.275 107.193,57.575 107.445,57.575
  F.Cu w0.15: R100.1@100.01,47.025 100.512,47.025 100.512,47.115 107.445,54.048 D9.1@107.445,54.525 107.445,57.575 ; R99.2@106.01,58.275 106.01,58.802 106.318,59.11 106.318,59.275 J13.1@107.095,59.275
TAMPER_IN_U1: C78.1 R100.2 U1.64 | length 59.9
  F.Cu w0.15: v2(60.985,43.825) 61.985,44.825 v2(61.985,45.525) ; U1.64@63.885,45.525 v2(64.285,45.525) ; v2(73.285,44.125) 73.885,43.525 88.185,43.525 91.585,46.925 97.185,46.925 97.285,47.025 98.485,47.025 ; 98.087,47.025 98.858,47.025 ; R100.2@99.36,47.025 98.858,47.025 ; C78.1@105.36,57.025 104.858,57.025 98.858,51.025 98.858,47.025
  In3.Cu w0.15: v2(60.985,43.825) 61.985,43.825 62.285,44.125 62.385,44.125 62.485,44.225 63.985,44.225 64.485,43.725 66.985,43.725 67.885,42.825 67.985,42.825 68.085,42.725 v2(68.485,42.725) ; v2(61.985,45.525) v2(64.285,45.525)
  B.Cu w0.15: v2(68.485,42.725) 69.285,42.725 70.885,44.325 71.085,44.325 71.185,44.425 72.985,44.425 v2(73.285,44.125)
TEST_UART_RX_TP: R102.1 TP_EOL.6 | length 14.7
  F.Cu w0.1: R102.1@42.585,41.925 42.585,41.575 42.635,41.525 v2(42.635,41.475)
  In3.Cu w0.1: v2(42.635,41.475) 42.635,42.975 42.685,43.025 42.685,43.575 42.735,43.625 42.735,43.675 42.785,43.725 42.785,44.225 42.835,44.275 42.835,44.375 43.135,44.675 v2(43.035,45.125)
  In5.Cu w0.1: v2(43.035,45.125) 44.685,46.675 45.235,46.675 45.285,46.725 45.385,46.725 45.785,47.125 45.785,47.375 45.835,47.425 45.835,47.525 46.185,47.875 v2(46.185,47.925)
  B.Cu w0.1: v2(46.185,47.925) 46.335,48.075 46.335,48.125 46.635,48.425 47.535,48.425 47.735,48.225 47.785,48.225 47.835,48.175 48.035,48.175 48.085,48.225 48.135,48.225 48.235,48.325 48.235,48.375 48.285,48.425 48.285,48.875 48.735,49.325 48.735,49.375 48.785,49.425 48.785,49.925 49.185,50.325 49.185,50.375 49.235,50.425 TP_EOL.6@49.235,51.325
TEST_UART_RX_U1: R102.2 U1.15 | length 14.6
  F.Cu w0.15: R102.2@41.86,42.025 v1(42.06,41.225) ; U1.15@47.935,44.025 v1(49.135,44.025)
  In3.Cu w0.15: v1(42.06,41.225) 44.66,38.125 45.36,38.225 46.56,39.825 47.16,39.925 48.485,40.425 48.485,41.225 48.435,42.525 v1(49.135,44.025)
TEST_UART_TX_TP: R101.2 TP_EOL.5 | length 12.5
  F.Cu w0.15: R101.2@42.51,44.025 42.51,43.498 43.134,43.498 v1(43.167,43.465)
  In3.Cu w0.15: v1(43.167,43.465) 43.34,43.465 43.87,43.994 43.87,46.631 v1(43.249,47.252)
  B.Cu w0.15: v1(43.249,47.252) 44.34,47.252 45.509,48.421 45.509,50.689 TP_EOL.5@46.845,52.025
TEST_UART_TX_U1: R101.1 U1.16 | length 7.2
  F.Cu w0.15: R101.1@41.86,44.025 41.86,44.552 42.023,44.715 44.093,44.715 44.608,44.2 46.499,44.2 47.058,43.641 47.058,43.525 U1.16@47.935,43.525
U8_MAIN_DTR_1V8: U8.30 U16.8 | length 34.4
  F.Cu w0.15: v1(23.81,37.906) 23.758,37.958 23.758,41.3 U16.8@24.785,41.3 ; v1(25.052,32.866) 25.985,31.933 25.985,23.188 33.735,15.438 U8.30@33.735,12.025
  B.Cu w0.15: v1(23.81,37.906) 24.097,37.619 24.097,33.82 v1(25.052,32.866)
U8_MAIN_RI_1V8: R31.2 U8.39 U16.5 | length 40.7
  F.Cu w0.15: R31.2@16.01,39.525 16.01,38.998 17.337,37.671 22.607,37.671 v1(22.889,37.952) ; U16.5@24.785,43.25 26.097,43.25 26.569,42.779 26.569,38.803 v1(26.242,38.477) ; v1(35.829,21.145) 35.849,21.125 U8.39@36.835,21.125
  B.Cu w0.15: v1(22.889,37.952) 22.932,37.952 23.457,38.477 v1(26.242,38.477) 27.643,37.077 27.643,33.527 36.203,24.967 36.203,21.519 v1(35.829,21.145)
U8_MAIN_RXD_1V8: U8.34 U16.7 | length 33.6
  F.Cu w0.15: U16.7@24.785,41.95 25.888,41.95 v1(26.001,41.837) ; v1(34.379,16.027) 34.781,15.625 U8.34@36.835,15.625
  In3.Cu w0.15: v1(26.001,41.837) 25.427,41.263 25.427,33.237 25.582,33.082 25.582,24.824 v1(34.379,16.027)
U8_MAIN_TXD_1V8: R30.2 U8.35 U16.3 | length 46.3
  F.Cu w0.15: R30.2@17.76,39.525 17.76,40.052 18.268,40.052 v1(18.318,40.102) ; U16.3@24.785,44.55 v1(26.005,44.55) ; v1(35.827,16.725) U8.35@36.835,16.725
  In3.Cu w0.15: v1(18.318,40.102) 18.833,39.586 18.833,38.676 19.262,38.248 19.951,38.248 ; v1(26.005,44.55) 24.402,42.947 24.402,42.12 22.154,39.873 21.448,39.873 19.951,38.375 19.951,38.248 ; v1(35.827,16.725) 34.581,15.48 34.181,15.48 20.464,29.197 20.464,35.343 19.951,35.855 19.951,38.248
U8_PWRKEY_N: C48.1 Q1.3 U8.15 | length 37.4
  F.Cu w0.15: v1(17.532,18.015) 17.708,17.839 17.708,16.725 U8.15@18.535,16.725 ; v1(19.686,42.255) 19.685,42.448 Q1.3@19.685,43.025 ; v1(21.856,38.894) 21.858,38.896 21.858,39.525 21.859,39.525 21.946,39.525 C48.1@22.36,39.525
  B.Cu w0.15: v1(17.532,18.015) 21.891,22.373 21.891,36.887 21.102,37.676 ; v1(19.686,42.255) 20.345,42.255 20.969,41.632 20.969,41.57 18.903,39.504 18.16,39.504 17.779,39.122 17.779,38.647 18.75,37.676 21.102,37.676 ; v1(21.856,38.894) 21.856,38.43 21.102,37.676
U8_RESET_N: Q2.3 U8.17 | length 31.7
  F.Cu w0.15: U8.17@18.535,14.525 19.362,14.525 19.362,16.039 v1(19.55,16.227) ; Q2.3@22.685,43.025 22.685,42.448 23.142,42.448 v1(23.563,42.027)
  B.Cu w0.15: v1(19.55,16.227) 19.55,19.038 22.34,21.828 22.34,38.149 22.383,38.191 22.383,40.017 23.563,41.197 v1(23.563,42.027)
U8_STATUS_1V8: U8.20 U16.4 | length 36.1
  F.Cu w0.15: U8.20@21.335,12.025 21.241,12.119 21.241,15.342 v1(21.335,15.436) ; U16.4@24.785,43.9 25.812,43.9 26.061,43.9 26.92,43.04 26.92,38.386 26.262,37.728 v1(25.97,37.728)
  B.Cu w0.15: v1(21.335,15.436) 25.97,20.071 v1(25.97,37.728)
U8_VDD_EXT_1V8: C33.1 R30.1 R31.1 R41.1 TP_CELL_DBG.1 U8.29 U16.1 U16.2 | length 98.1
  F.Cu w0.225: 15.36,40.126 16.585,40.126
  F.Cu w0.3: R31.1@15.36,39.525 15.36,40.126 ; 16.585,40.126 17.11,39.601 R30.1@17.11,39.525 17.11,38.824 v1(17.112,38.822) ; v1(20.534,42.854) 20.765,42.854 21.41,43.499 21.41,44.03 21.965,44.586 21.965,45.381 C33.1@22.36,45.775 22.36,46.377 23.42,46.377 23.683,46.114 23.683,45.85 U16.1@24.785,45.85 25.887,45.85 25.887,45.2 ; U16.2@24.785,45.2 25.887,45.2 ; v1(27.078,44.595) 26.473,45.2 25.887,45.2 ; v1(30.935,13.036) 31.044,12.927 32.635,12.927 U8.29@32.635,12.025 ; v1(39.513,18.178) 40.212,18.877 42.508,18.877 R41.1@43.11,18.275 ; v1(50.77,42.42) 51.01,42.661 v1(51.01,44.425)
  In3.Cu w0.3: v1(20.534,42.854) 20.527,42.86 18.82,42.86 18.769,42.809 18.399,42.809 17.112,41.522 v1(17.112,38.822) 17.462,38.472 17.462,26.509 v1(30.935,13.036) 32.229,14.329 v1(32.229,15.253)
  B.Cu w0.3: v1(27.078,44.595) 27.74,44.595 29.021,43.314 36.374,43.314 37.406,42.282 47.812,42.282 48.202,42.672 50.518,42.672 v1(50.77,42.42) ; v1(32.229,15.253) 35.155,18.178 v1(39.513,18.178)
U13_EN_N: Q3.3 R44.2 U13.20 | length 13.3
  F.Cu w0.15: Q3.3@32.185,57.025 32.812,57.025 33.062,57.275 33.772,57.275 ; v1(33.772,57.826) 33.772,57.275 ; R44.2@34.86,57.275 33.772,57.275 ; v1(40.466,58) 40.534,58.069 43.017,58.069 U13.20@43.085,58
  B.Cu w0.15: v1(33.772,57.826) 34.553,58.607 39.859,58.607 v1(40.466,58)
USB_CC1: D7.1 J11.A5 R93.1 | length 8.5
  F.Cu w0.15: v2(44.498,66.408) 44.498,65.06 45.348,64.21 47.36,64.21 ; R93.1@47.36,63.525 47.36,64.21 ; D7.1@47.685,64.535 47.36,64.21
  B.Cu w0.15: v2(44.498,66.408) v2(46.935,67.67)
USB_CC2: D8.1 J11.B5 R94.1 | length 5.3
  F.Cu w0.15: R94.1@41.86,63.525 41.86,64.21 D8.1@42.185,64.535 42.662,64.535 43.935,65.808 J11.B5@43.935,67.67
USB_DM_CONN: J11.A7 J11.B7 R92.2 U25.2 | length 55.4
  F.Cu w0.15: R92.2@68.085,48.825 68.185,48.825 68.285,48.925 68.385,48.925 68.485,49.025 68.685,49.025 68.785,49.125 68.885,49.125 68.985,49.225 69.085,49.225 69.185,49.325 71.485,49.325 71.585,49.425 71.685,49.425 71.985,49.725 74.885,49.725 v2(76.085,50.925) ; v2(73.985,57.625) v2(73.985,58.825)
  F.Cu w0.154: U25.2@45.335,66.2 45.335,66.558 45.502,66.725 45.502,66.908 45.435,66.975 J11.A7@45.435,67.67 45.435,68.625 46.435,68.625 J11.B7@46.435,67.67
  In3.Cu w0.15: v2(45.285,66.325) 45.885,65.725 51.485,65.725 54.485,62.725 64.685,62.725 64.785,62.625 64.885,62.625 67.585,59.925 68.285,59.925 68.385,59.825 71.685,59.825 72.685,58.825 v2(73.985,58.825) ; v2(73.985,57.625) 73.985,57.125 76.885,54.225 76.885,54.125 77.285,53.725 77.285,53.625 77.385,53.525 77.385,53.425 77.585,53.225 77.585,53.125 77.685,53.025 77.685,52.925 77.785,52.825 77.785,52.625 77.685,52.525 77.685,52.425 77.585,52.325 77.585,52.225 77.385,52.025 77.285,52.025 77.185,51.925 77.085,51.925 v2(76.085,50.925)
USB_DM_U1: R92.1 U1.70 | length 4.2
  F.Cu w0.154: U1.70@63.435,48.525 64.385,48.525 64.885,48.675 65.285,48.818 65.385,48.818 65.635,48.57 65.885,48.818 67.035,48.818 R92.1@67.36,48.775